# Altium PCB PCB1_Esta_SI.PcbDoc (part 2 of 2)
Units mil, origin at the board's own origin, x right, y up, seen from the top; angles counter-clockwise.
Board outline 3825 x 4015 mil, 4 copper layers (Top Layer, GND, POWER_SIGNAL, Bottom Layer), stack 23.756 mil thick; 87 components, 73 nets, 564 pads, 160 vias.
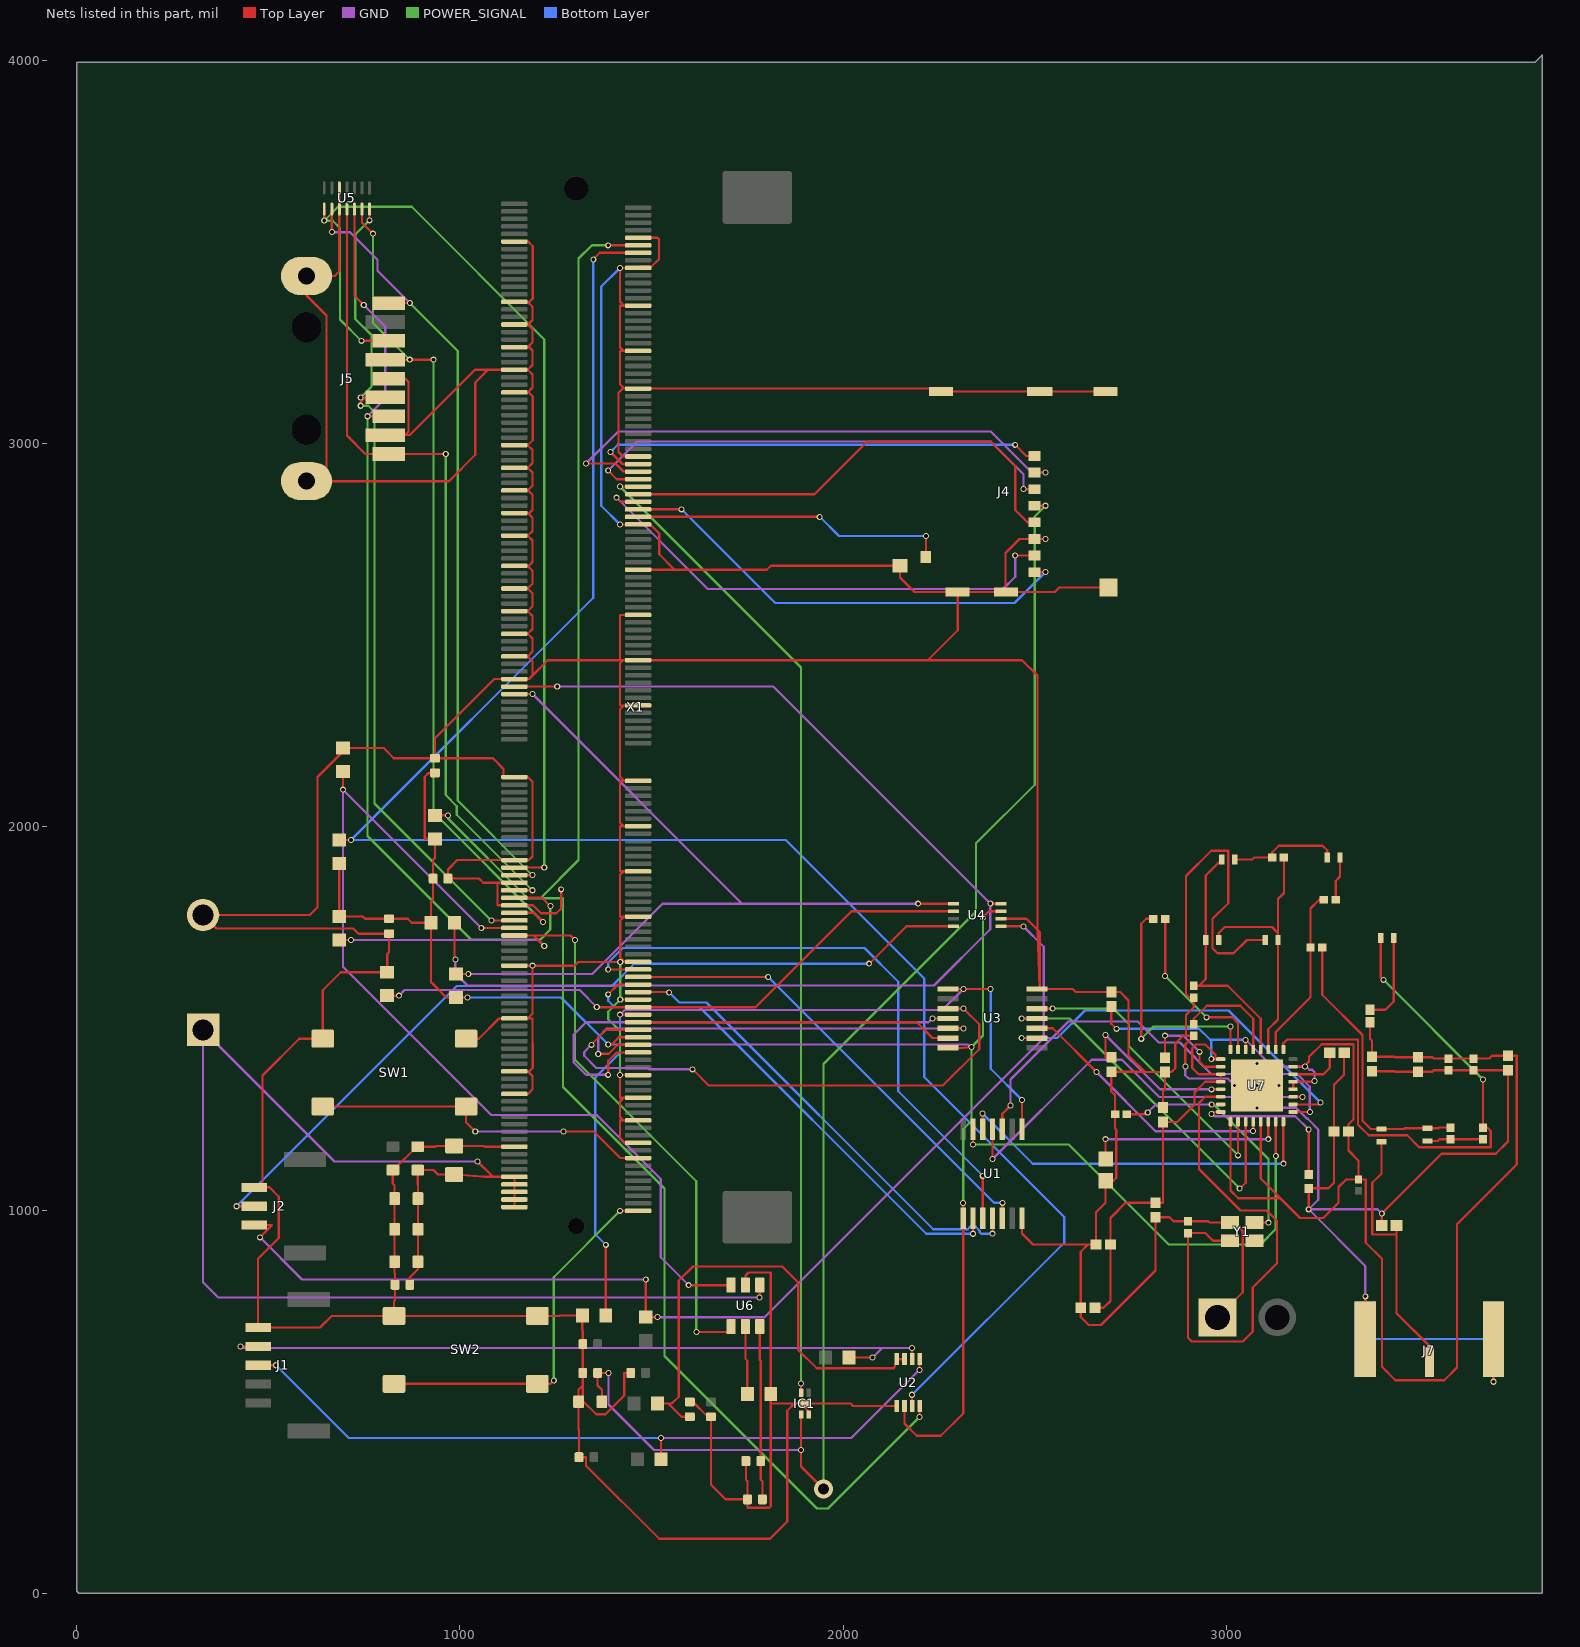
[diagram p4: the nets of this part, all layers, seen from the top]

## Via types
v1: diameter 15.75, hole 10, Top Layer to Bottom Layer, 154 vias
v2: diameter 19.68, hole 7.87, Top Layer to Bottom Layer, 5 vias
v3: diameter 50, hole 28, Top Layer to Bottom Layer, 1 vias

## Nets (pads, with @x,y where several pads share a name; then routed paths per layer and width w, separated by ;. In a path a pad name is that pad's centre, name@x,y a point inside that pad or via, vN(x,y) a via of type N, cw(c..) or ccw(c..) an arc to the next point about the centre after c; other vN are vias at no path point) (continued)
+1V8_SOM: C3.2 C4.2 C7.2 R3.1 R5.1 R6.1 R7.1 R11.1 U1.1 U2.2 U3.14 U4.3 X1.214 | length 4217.2
  Top Layer w5.91: R3.1@685,1904.42 R11.1@685,1766.16 746,1766.16 752.16,1760 C3.2@815,1760 864,1760 874,1750 R5.1@924.42,1750 ; C7.2@935,2140.71 917.71,2140.71 908,2131 908,1968.84 R7.1@935,1968.84 935,1919 930,1914 C4.2@930,1865 930,1809.58 924.42,1804 R5.1@924.42,1750 ; v1(1020,1555) R6.1@990,1555 964.42,1555 924.42,1595 R5.1@924.42,1750 ; v1(1387,1432) 1396,1432 1414.79,1450.79 X1.214@1465,1450.79 ; U2.2@2160.16,488.98 2160.16,443 2192.16,411 2255,411 2313.23,469.23 U1.1@2313.23,978.86 v1(2313.23,1018.77) ; U3.14@2273.86,1423.23 2314.37,1423.23 2315.36,1424.21 2333.82,1424.21 v1(2334.81,1425.19) ; v1(2365,1763.85) 2381,1779.85 U4.3@2411.89,1779.85
  GND w5.91: v1(1387,1432) 2325.34,1432 2332.14,1425.19 v1(2334.81,1425.19)
  POWER_SIGNAL w5.91: v1(2313.23,1018.77) 2313.23,1211.19 2334.81,1232.77 v1(2334.81,1425.19) ; v1@2335,1425 2335,1425.39 2365,1455.39 v1(2365,1763.85)
  Bottom Layer w5.91: v1(1020,1555) 1264,1555 v1(1387,1432)
+3V3_SD: C15.2 C16.2 IC1.1 J4.C4 | length 3795.2
  Top Layer w5.91: C15.2@1370.51,500 1370.51,531 1359.29,542.22 C16.2@1359.29,575 v1(1388,575) ; IC1.1@1890.16,466.46 v1(1890.16,374) 1890.16,330.84 v3(1949,272) ; J4.C4@2499.61,2838.03 v1(2528,2838.03)
  GND w5.91: v1(1388,575) 1388,492.53 1506.53,374 v1(1890.16,374)
  POWER_SIGNAL w5.91: v3(1949,272) 1949,1381 2347,1779 2347,1957 2500,2110 2500,2810.03 v1(2528,2838.03)
+5V_CAM_USB: C18.2 C19.2 U6.6 | length 453.7
  Top Layer w5.91: U6.6@1782.4,695.87 1782.4,608.6 1785,606 C19.2@1785,345 1785,296.29 1789.29,292 C18.2@1789.29,245
+5V_SOM: C8.2 C9.2 C10.2 C12.2 C13.2 C17.2 J3.1 U6.1 X1.251 X1.253 X1.255 X1.257 X1.259 | length 3719.2
  Top Layer w5.91: C17.2@869.29,805 869.29,824 890.51,845.22 C8.2@890.51,865 C9.2@890.51,950 C10.2@890.51,1030 890.51,1066 890,1066.51 C12.2@890,1104.49 931,1104.49 942.89,1092.6 C13.2@985,1092.6 1065.98,1086.61 1086,1086.61 ; v1(1045.61,1127) 1086,1086.61 ; X1.259@1142.17,1007.87 X1.257@1142.17,1027.56 X1.255@1142.17,1047.24 X1.253@1142.17,1066.93 X1.251@1142.17,1086.61 1086,1086.61 ; v1(1782,772) 1782.4,772.4 U6.1@1782.4,804.13
  GND w5.91: v1(1045.61,1127) 672.69,1127 J3.1@329.69,1470 329.69,811.31 369,772 v1(1782,772)
ADCS_RX: J2.3 R8.1 U4.1 | length 2954.6
  Top Layer w5.91: J2.3@463.46,960.79 509.8,960.79 v1(478.01,928.99) ; v1(1485,819) R8.1@1485,720.58 v1(1516,720.58) ; U4.1@2411.89,1740.47 2470.53,1740.47 v1(2471,1740)
  GND w5.91: v1(478.01,928.99) 588,819 v1(1485,819) ; v1(1516,720.58) 1795.12,720.58 2523.54,1449 2523.54,1687.46 v1(2471,1740)
ADCS_TX: J2.2 U4.8 | length 2220.1
  Top Layer w5.91: v1(417,1010) J2.2@463.46,1010 ; v1(2068.1,1643) 2165.57,1740.47 U4.8@2288.11,1740.47
  Bottom Layer w5.91: v1(417,1010) 992,1585 1397,1585 1455,1643 v1(2068.1,1643)
CAM_USB_D_N: J5.2 U5.13 X1.181 | length 2241.3
  Top Layer w5.91: U5.13@744.37,3612.42 744.37,3576.63 v1(773,3548) ; J5.2@805.07,3219.21 v1(869,3219.21) v1(931,3219.21) ; X1.181@1142.17,1775.59 1193.41,1775.59 v1(1217.08,1751.92)
  POWER_SIGNAL w5.91: v1(773,3548) 773,3315.21 v1(869,3219.21) ; v1(931,3219.21) 931,2038 v1(1217.08,1751.92)
CAM_USB_D_P: J5.3 U5.14 X1.183 | length 2183
  Top Layer w5.91: v1(741,3099) 741,3108.79 753,3120.79 ; v1(741,3120.79) 753,3120.79 ; v1(764,3583) 764.06,3583.06 U5.14@764.06,3612.42 ; J5.3@805.07,3120.79 753,3120.79 ; v1(1082,1755.91) X1.183@1142.17,1755.91
  POWER_SIGNAL w5.91: v1(741,3099) 761,3099 777,3083 777,2060.91 v1(1082,1755.91) ; v1(741,3120.79) 769,3148.79 769,3283.39 727,3325.39 727,3546 v1(764,3583)
CAM_USB_EN: R13.2 U6.3 X1.185 | length 2582.5
  Top Layer w5.91: v1(695,2097) R13.2@695,2144.42 ; v1(1055.78,1736.22) X1.185@1142.17,1736.22 ; v1(1597,804) 1707.6,804 U6.3@1707.6,804.13
  GND w5.91: v1(1055.78,1736.22) v1(695,2097) 695,1635 1082,1248 1357,1248 1524,1081 1524,877 v1(1597,804)
CAM_USB_OC_N: R11.2 U6.4 X1.187 | length 2002
  Top Layer w5.91: R11.2@685,1705 v1(716,1705) ; X1.187@1142.17,1716.54 1192.46,1716.54 ; v1(1220,1689) 1192.46,1716.54 ; v1(1300,1705) 1288.46,1716.54 1192.46,1716.54 ; v1(1617,682) 1707.6,682 U6.4@1707.6,695.87
  GND w5.91: v1(716,1705) 1204,1705 v1(1220,1689)
  POWER_SIGNAL w5.91: v1(1300,1705) 1300,1392 1617,1075 v1(1617,682)
CAM_USB_RX_N: J5.5 U5.11 X1.175 | length 2148.1
  Top Layer w5.91: U5.11@705,3612.42 705,3021.15 753,2973.15 J5.5@813.93,2973.15 v1(963,2973.15) ; X1.175@1142.17,1834.65 v1(1189,1834.65)
  POWER_SIGNAL w5.91: v1(963,2973.15) 963,2083 992,2054 992,2031.65 v1(1189,1834.65)
CAM_USB_RX_P: J5.6 U5.12 X1.177 | length 2507.8
  Top Layer w5.91: U5.12@724.69,3612.42 724.69,3386.31 v1(749,3362) ; v1(758.74,3071.57) J5.6@813.93,3071.57 ; X1.177@1142.17,1814.96 1214.21,1814.96 v1(1236,1793.17)
  GND w5.91: v1(749,3362) 805,3306 805,3117.84 v1(758.74,3071.57)
  POWER_SIGNAL w5.91: v1(758.74,3071.57) 758.74,1976.26 1029,1706 1210,1706 1236,1732 v1(1236,1793.17)
CAM_USB_TX_N: J5.8 U5.8 X1.169 | length 2656.6
  Top Layer w5.91: v1(645.94,3582) U5.8@645.94,3612.42 ; v1(742.74,3268.43) J5.8@813.93,3268.43 ; X1.169@1142.17,1893.7 v1(1220,1893.7)
  POWER_SIGNAL w5.91: v1(742.74,3268.43) 687,3324.16 687,3563 668,3582 v1(645.94,3582) 681.94,3618 874,3618 1220,3272 v1(1220,1893.7)
CAM_USB_TX_P: J5.9 U5.9 X1.171 | length 2084.8
  Top Layer w5.91: U5.9@665.63,3612.42 665.63,3552.37 v1(666,3552) ; J5.9@813.93,3366.85 v1(869.13,3366.85) ; X1.171@1142.17,1874.02 v1(1189,1874.02)
  GND w5.91: v1(666,3552) 713,3552 785,3480 785,3450.98 v1(869.13,3366.85)
  POWER_SIGNAL w5.91: v1(869.13,3366.85) 993.99,3241.99 993.99,2069.02 v1(1189,1874.02)
EPS_SCL: J1.2 R1.1 U2.6 | length 1927.6
  Top Layer w5.91: v1(427,644) 427.21,644.21 J1.2@473.46,644.21 ; R1.1@2015,615 v1(2077,615) ; U2.6@2179.84,611.02 2179.84,639.84 v1(2180,640)
  GND w5.91: v1(427,644) 431,640 2102,640 ; v1(2077,615) 2102,640 ; v1(2180,640) 2102,640
EPS_SDA: J1.3 R2.1 U2.5 | length 1961.5
  Top Layer w5.91: J1.3@473.46,595 v1(520,595) ; R2.1@1525,350 v1(1525,405) ; v1(2199.53,583) U2.5@2199.53,611.02
  GND w5.91: v1(1525,405) 2021.53,405 v1(2199.53,583)
  Bottom Layer w5.91: v1(520,595) 710,405 v1(1525,405)
GND: C1.1 C2.1 C3.1 C4.1 C5.1 C6.1 C7.1 C8.1 C9.1 C10.1 C11.1 C12.1 C13.1 C14.1 C15.1 C16.1 C17.1 C18.1 C19.1 C20.2 C21.2 C22.1 C23.1 C24.1 C25.1 C26.1 C28.1 C29.1 C30.2 C31.2 C32.1 C34.2 C38.2 C40.1 C41.1 C42.2 C43.2 C44.2 IC1.2 IC1.5 J1.1 J2.1 J3.2 J4.1 J4.3 J4.4 J4.5 J4.6 J4.7 J4.8 J4.C6 J5.4 J5.7 J5.Shell J6.1 J7.2 J7.3 J7.4 J7.5 L4.1 R9.1 R10.1 R12.1 R13.1 R14.1 R16.1 SW1.1 SW1.2 SW2.1 SW2.2 U1.7 U2.1 U3.7 U4.2 U5.5 U5.10 U6.2 U7.33 X1.10 X1.11 X1.18 X1.27 X1.28 X1.33 X1.39 X1.40 X1.45 X1.50 X1.51 X1.65 X1.68 X1.71 X1.77 X1.83 X1.86 X1.89 X1.97 X1.98 X1.103 X1.109 X1.110 X1.115 X1.121 X1.122 X1.127 X1.134 X1.145 X1.146 X1.158 X1.167 X1.170 X1.173 X1.179 X1.182 X1.194 X1.195 X1.204 X1.209 X1.223 X1.224 X1.229 X1.230 X1.236 X1.242 X1.243 Y1.2 Y1.4 | length 31570.9
  Top Layer w5.91: J2.1@463.46,1059.21 J2.1@485,1059.21 ; J5.Shell@599.56,2902.28 J5.Shell@652,2902.28 ; U5.5@685.32,3667.58 U5.10@685.32,3612.42 685.32,3450.03 673,3437.72 J5.Shell@599.56,3437.72 599.56,3387 652,3334.56 J5.Shell@652,2902.28 ; J5.4@805.07,3022.36 857,3022.36 ; J5.7@813.93,3170 857,3170 866,3161 866,3031.36 857,3022.36 ; SW1.1@1016.02,1447.29 1049,1447.29 1101.71,1500 X1.209@1142.17,1500 1177,1500 ; X1.243@1142.17,1165.35 1064.05,1165.35 1062,1167.4 C13.1@985,1167.4 937.89,1167.4 936,1165.51 C12.1@890,1165.51 887.02,1165.51 826,1104.49 C11.1@825,1104.49 825,1069.49 829.49,1065 C10.1@829.49,1030 C9.1@829.49,950 C8.1@829.49,865 829.49,835.22 830.71,834 C17.1@830.71,805 830.71,764.72 827.99,762 SW2.2@827.99,723.58 ; X1.229@1142.17,1303.15 1177.64,1303.15 1189.49,1315 1189.49,1349.71 1179.1,1360.1 ; X1.195@1142.17,1637.8 v1(1189.49,1637.8) ; X1.173@1142.17,1854.33 1098,1854.33 ; X1.121@1142.17,2444.88 1177,2444.88 ; X1.115@1142.17,2503.94 1177,2503.94 ; X1.109@1142.17,2562.99 1177,2562.99 ; X1.103@1142.17,2622.05 1177,2622.05 ; X1.97@1142.17,2681.1 1177,2681.1 ; X1.89@1142.17,2759.84 1177,2759.84 ; X1.83@1142.17,2818.9 1177,2818.9 ; X1.77@1142.17,2877.95 1177,2877.95 ; X1.71@1142.17,2937.01 1177,2937.01 ; X1.65@1142.17,2996.06 1177,2996.06 ; X1.33@1142.17,3311.02 1177.47,3311.02 ; X1.11@1142.17,3527.56 1177.44,3527.56 1190,3515 1190,3379 1179.04,3368.04 ; v1(1264.21,1837.17) 1264.21,1787 1251.66,1774.45 1211.59,1774.45 1190.76,1795.28 X1.179@1142.17,1795.28 1098,1795.28 1098,1854.33 ; v1(1417.68,2789.37) X1.86@1465,2789.37 1467.95,2786.42 1499.42,2786.42 1520,2765.84 1520,2711.26 1560,2671.26 ; v1(1418.36,1549.21) X1.204@1465,1549.21 ; C5.1@1445.71,575 1429,575 1429,516.29 1379.71,467 1355.71,467 1320.71,502 1320.71,542.22 ; X1.242@1465,1175.2 1429.48,1175.2 1417.68,1187 1417.68,1234.25 1426.42,1234.25 ; X1.236@1465,1234.25 1426.42,1234.25 ; X1.230@1465,1293.31 1427.98,1293.31 ; X1.224@1465,1352.36 v1(1418,1352.36) 1417.68,1352.36 1417.68,1293.31 1427.98,1293.31 ; X1.194@1465,1647.64 1429.72,1647.64 ; X1.182@1465,1765.75 1428.42,1765.75 ; X1.170@1465,1883.86 1426.53,1883.86 ; X1.158@1465,2001.97 1426.71,2001.97 ; X1.146@1465,2120.08 1428.6,2120.08 ; X1.134@1465,2316.93 1427.61,2316.93 ; X1.110@1465,2553.15 1417.68,2553.15 1417.68,2435.04 1425.72,2435.04 ; X1.98@1465,2671.26 1560,2671.26 ; X1.68@1465,2966.54 1425.46,2966.54 1414,2978 1414,3132.7 1426.99,3145.69 ; X1.40@1465,3242.13 1426.55,3242.13 ; X1.28@1465,3360.24 1428.44,3360.24 ; X1.10@1465,3537.4 1515.79,3537.4 1519.25,3533.94 1519.25,3481.44 1499.42,3461.61 1467.95,3461.61 X1.18@1465,3458.66 v1(1417.68,3458.66) 1417.68,3371 1428.44,3360.24 ; C1.1@1600,499.29 1608,499.29 1646.58,460.71 C6.1@1655,460.71 1655,283 1693,245 C18.1@1750.71,245 ; U6.2@1745,804.13 1745,829 1753,837 1811,837 1811.16,836.84 R12.1@1811.16,520 1811.16,495 ; C19.1@1746.42,345 1746.42,296.29 1750.71,292 C18.1@1750.71,245 ; IC1.2@1909.84,466.46 1909.84,475 1900,484.84 IC1.5@1900,495 ; U2.1@2140.47,488.98 2026.02,488.98 2020,495 IC1.5@1900,495 ; U4.2@2411.89,1760.16 2478.63,1760.16 2507,1731.79 ; U1.7@2466.77,978.86 2466.77,939 2495.77,910 2639,910 ; U3.7@2506.14,1576.77 U3.7@2513,1576.77 ; v1(2528.23,2751.42) J4.C6@2499.61,2751.42 2460.42,2751.42 2424,2715 J4.5@2424,2612.83 ; J4.8@2684.65,3136.46 J4.6@2513.39,3136.46 J4.3@2255.51,3136.46 2236,3136.46 2236,3143.7 X1.50@1465,3143.7 ; J4.7@2692.52,2624.64 2563.81,2624.64 2552,2612.83 J4.5@2424.8,2612.83 J4.5@2424,2612.83 ; C24.1@2835,1267.68 2835,1311 2840,1316 C25.1@2840,1360 ; v1(2893.05,1375) 2893.05,1431.91 2915,1453.86 C31.2@2915,1454.65 2895,1454.65 ; J6.1@2977.05,719.88 3043,785.83 3043,942.24 ; v2(3021.93,1325) v2(3080,1266.93) ; Y1.4@3073.98,920 3065.24,920 3043,942.24 ; L4.1@3101.54,1705 3054,1705 3019,1670 2977,1670 2964,1683 2964,1760 3005,1801 3005,1938 2961,1938 2895,1872 2895,1563 2903.35,1554.65 C28.1@2915,1554.65 2915,1529 2895,1509 2895,1454.65 ; v1(3215,1002) R14.1@3215,1056.73 3266.57,1056.73 3281.16,1071.32 C26.1@3281.16,1205 3281.16,1326.85 3307.4,1353.09 R16.1@3307.4,1410 ; J7.2@3362.68,663.31 v1(3362.68,775) ; C44.2@3380,1362.32 3439,1362.32 3440.16,1361.16 C43.2@3500,1361.16 3538,1361.16 3541.49,1364.65 C42.2@3580,1364.65 C41.1@3645,1364.65 3689,1364.65 3689.35,1365 C38.2@3735,1365 3735,1179 3703,1147 3561.71,1147 v1(3405.71,991) C40.1@3405.71,960 ; v1(3697,552) 3697.32,552.32 J7.3@3697.32,663.31 ; J2.1@485,1059.21 485,1351.29 581,1447.29 SW1.2@642.01,1447.29 642,1573.58 689,1620.58 R9.1@810,1620.58 810,1668 815,1673 C3.1@815,1721.42 735,1721.42 721.42,1735 364.69,1735 J3.2@329.69,1770 608,1770 628,1790 628,2130 695,2197 R13.1@695,2205.58 801,2205.58 827.29,2179.29 C7.1@935,2179.29 ; J2.1@485,1059.21 502.79,1059.21 527,1035 527,927 473,873 473,693.43 J1.1@473.46,693.43 635,693.43 665.16,723.58 SW2.2@827.99,723.58 ; J5.Shell@652,2902.28 971.28,2902.28 1040,2971 1040,3159.91 1073,3192.91 ; SW2.2@827.99,723.58 SW2.1@1202.01,723.58 1260,723.58 1261.42,725 R10.1@1319.42,725 1319.42,687.29 1320.71,686 C14.1@1320.71,650 C16.1@1320.71,575 1320.71,542.22 ; 857,3022.36 869,3022.36 1039.55,3192.91 1073,3192.91 ; C7.1@935,2179.29 1086,2179.29 1114,2151.29 1114,2129.92 X1.145@1142.17,2129.92 1177,2129.92 1189.49,2117.43 1189.49,1923 1179.88,1913.39 X1.167@1142.17,1913.39 993,1913.39 968.58,1888.97 C4.1@968.58,1865 1050,1865 1060.67,1854.33 1098,1854.33 ; C7.1@935,2179.29 935,2231 1089.83,2385.83 X1.127@1142.17,2385.83 1180.32,2385.83 1189.49,2395 ; 1073,3192.91 X1.45@1142.17,3192.91 1177,3192.91 ; 1177,1500 1189.49,1500 1190,1371 1179.1,1360.1 ; 1177,1500 1189.49,1512.49 v1(1189.49,1637.8) ; 1177,2444.88 1189.49,2432.39 1189.49,2395 ; 1177,2444.88 1189.49,2457.37 1189.49,2491.45 1177,2503.94 ; 1177,2503.94 1189.49,2516.43 1189.49,2550.5 1177,2562.99 ; 1177,2562.99 1189.49,2575.48 1189.49,2609.56 1177,2622.05 ; 1177,2622.05 1189.49,2634.54 1189.49,2668.61 1177,2681.1 ; 1177,2681.1 1179.59,2681.1 1189.49,2691 1189.49,2747.35 1177,2759.84 ; 1177,2759.84 1189.49,2772.33 1189.49,2806.41 1177,2818.9 ; 1177,2818.9 1181.39,2818.9 1189.49,2827 1189.49,2867 1178.54,2877.95 1177,2877.95 ; 1177,2877.95 1189.49,2890.44 1189.49,2924.52 1177,2937.01 ; 1177,2937.01 1189.49,2949.5 1189.49,2983.57 1177,2996.06 ; 1177,2996.06 1190,3009.06 1190,3123 1178.07,3134.93 ; 1177,3192.91 1189.49,3180.42 1189.49,3146.35 1178.07,3134.93 ; 1177,3192.91 1189.49,3205.4 1189.49,3243 1178.76,3253.73 ; 1177.47,3311.02 1189.49,3299 1189.49,3264.46 1178.76,3253.73 ; 1177.47,3311.02 1189.49,3323 1189.49,3357.59 1179.04,3368.04 ; 1178.07,3134.93 1177,3133.86 X1.51@1142.17,3133.86 1178.07,3134.93 ; 1178.76,3253.73 X1.39@1142.17,3251.97 1177,3251.97 1178.76,3253.73 ; 1179.04,3368.04 1177,3370.08 X1.27@1142.17,3370.08 1179.04,3368.04 ; 1179.1,1360.1 1176.89,1360.23 X1.223@1142.17,1362.2 1177,1362.2 1179.1,1360.1 ; v1(1189.49,1637.8) 1298.93,1637.8 1308.77,1647.64 v1(1418.36,1647.64) 1429.72,1647.64 ; 1189.49,2395 1229.49,2435 1425.68,2435 ; 1320.71,542.22 1309.49,531 C15.1@1309.49,500 1309.49,427.22 1310.71,426 C2.1@1310.71,355 1329,355 1329,333 1520,142 1809,142 1854,187 1854,476 1873,495 ; 1425.68,2435 2467,2435 2507,2395 2507,1731.79 ; 1425.68,2435 1417.68,2427 1417.68,2316.93 1427.61,2316.93 ; 1425.68,2435 1425.72,2435.04 ; 1425.72,2435.04 X1.122@1465,2435.04 2221.04,2435.04 2298.82,2512.82 J4.4@2298.82,2612.83 ; 1426.42,1234.25 1417.68,1243 1417.68,1283 1427.98,1293.31 ; 1426.53,1883.86 1417.68,1883.86 1417.68,2001.97 1426.71,2001.97 ; 1426.53,1883.86 1417.68,1875 1417.68,1765.75 1428.42,1765.75 ; 1426.55,3242.13 1417.68,3242.13 1417.68,3155 1426.99,3145.69 ; 1426.55,3242.13 1417.68,3251 1417.68,3360.24 1428.44,3360.24 ; 1426.71,2001.97 1417.68,2011 1417.68,2120.08 1428.6,2120.08 ; 1426.99,3145.69 1428.98,3143.7 X1.50@1465,3143.7 ; 1426.99,3145.69 X1.50@1465,3143.7 ; 1427.61,2316.93 1417.68,2307 1417.68,2131 1428.6,2120.08 ; 1428.42,1765.75 1418.36,1755.69 1418.36,1659 1429.72,1647.64 ; 1560,2671.26 1801,2671.26 1811.47,2681.73 J4.1@2148.43,2681.73 2148.43,2650.57 2186.17,2612.83 J4.4@2298.82,2612.83 ; C18.1@1750.71,245 1750.71,223 1807,223 1811.16,227.16 1811.16,495 ; 1811.16,495 1873,495 ; 1873,495 IC1.5@1900,495 ; J4.4@2298.82,2612.83 J4.5@2424,2612.83 ; 2507,1731.79 2513,1725.79 U3.7@2513,1576.77 ; 2507,1731.79 2512.99,1577.04 U3.7@2513,1576.77 ; U3.7@2513,1576.77 2599,1576.77 2606.93,1568.84 C30.2@2700,1568.84 2723.16,1568.84 2745,1547 2745,1403 2788,1360 ; 2639,910 2620,891 C29.1@2620,745 2620,721 2641,700 2673,700 2815,842 C23.1@2815,981.16 2852,981.16 2862.45,970.71 C21.2@2900,970.71 2953,970.71 2956.46,967.24 Y1.2@3010,967.24 3021.24,967.24 3043,945.48 3043,942.24 ; 2639,910 C32.1@2660,910 2660,994 2685,1019 C34.2@2685,1076.42 2705,1076.42 2713,1084.42 2713,1209.65 2709.65,1213 C20.2@2709.65,1250 2709.65,1300 2700,1309.65 C22.1@2700,1361.16 2769,1361.16 2770.16,1360 2788,1360 ; 2788,1360 C25.1@2840,1360 ; C25.1@2840,1360 2857,1360 2867,1370 2867,1435 2886.65,1454.65 2895,1454.65
  GND w5.91: v1(2893.05,1375) 2893.05,1351.95 2901.81,1343.19 3003.74,1343.19 v2(3021.93,1325) ; v2(3080,1266.93) 3181.78,1266.93 3210.56,1238.15 3212.24,1238.15 3240,1210.39 3240,1027 v1(3215,1002) ; v1(3362.68,775) 3362.68,854.32 v1(3215,1002) ; v1(3405.71,991) 3394.71,1002 v1(3215,1002)
  POWER_SIGNAL w5.91: v1(1418,1352.36) 1418,1467 1387,1498 1387,1517.85 v1(1418.36,1549.21) v1(1418.36,1647.64)
  Bottom Layer w5.91: v1(1417.68,2789.37) 1369.05,2838 1369.05,3410.03 v1(1417.68,3458.66) ; v1(3362.68,775) J7.4@3362.68,663.31 J7.5@3697.32,663.31 3697.32,552.32 v1(3697,552)
  other v2: 3080,1325 3138.07,1325 3080,1383.07
GPIO0: U3.2 U7.10 | length 1023.1
  Top Layer w5.91: v1(2466,1449) 2466.18,1448.82 U3.2@2506.14,1448.82 ; U7.10@3174.49,1275.79 3240.79,1275.79 v1(3246,1281)
  Bottom Layer w5.91: v1(2466,1449) 2559,1449 2631,1521 3006,1521 v1(3246,1281)
GPIO2: U3.3 U7.4 | length 699.6
  Top Layer w5.91: U3.3@2506.14,1474.41 2547,1474.41 v1(2661.41,1360) ; v1(3070,1206) 3070.16,1206.16 U7.4@3070.16,1230.51
  GND w5.91: v1(2661.41,1360) 2815.41,1206 v1(3070,1206)
GPIO3: U3.4 U7.3 | length 974
  Top Layer w5.91: v1(2466,1500) U3.4@2506.14,1500 ; v1(3035,1056) 3050.47,1071.47 U7.3@3050.47,1230.51
  POWER_SIGNAL w5.91: v1(2466,1500) 2591,1500 v1(3035,1056)
I2C_1_SCL: R3.2 U2.3 X1.14 | length 5008.8
  Top Layer w5.91: R3.2@685,1965.58 v1(715.83,1965.58) ; v1(1348,3481) 1365.03,3498.03 X1.14@1465,3498.03 ; U2.3@2179.84,488.98 2179.84,517.84 v1(2180,518)
  Bottom Layer w5.91: v1(1348,3481) 1348,2597.75 v1(715.83,1965.58) 1850.42,1965.58 2212,1604 2212,1347 2577,982 2577,915 v1(2180,518)
I2C_1_SDA: R7.2 U2.4 X1.12 | length 4570.7
  Top Layer w5.91: R7.2@935,2030 v1(969,2030) ; v1(1387,3517.72) X1.12@1465,3517.72 ; v1(2199.53,460) U2.4@2199.53,488.98
  POWER_SIGNAL w5.91: v1(969,2030) 969,2022 1177,1814 1210,1814 ; v1(1387,3517.72) 1344.43,3517.72 1309.72,3483 1309.72,1913.72 1210,1814 ; v1(2199.53,460) 1960.53,221 1932,221 1534,619 1534,1056 1268.73,1321.27 1268.73,1813.35 1268.08,1814 1210,1814
NetC1_2: C1.2 R4.2 U2.7 U2.8 | length 1271.5
  Top Layer w5.91: R4.2@1515.58,495 1543.71,495 ; C1.2@1600,460.71 1578,460.71 1543.71,495 ; U2.7@2160.16,611.02 U2.8@2140.47,611.02 2132.47,587 1931,587 1883,635 1883,811 1841,853 1608,853 1571,816 1571,513 1553,495 1543.71,495
NetC20_1: C20.1 U7.31 Y1.1 | length 665.2
  Top Layer w5.91: C20.1@2740.35,1250 2790,1250 v1(2795,1255) ; v1(2961.9,1275.79) U7.31@2985.51,1275.79 ; Y1.1@3073.98,967.24 3109.76,967.24 v1(3110,967)
  GND w5.91: v1(2795,1255) 2815.79,1275.79 v1(2961.9,1275.79)
  POWER_SIGNAL w5.91: v1(2961.9,1275.79) 2967.21,1275.79 3110,1133 v1(3110,967)
NetC21_1: C21.1 U7.30 Y1.3 | length 1384.8
  Top Layer w5.91: U7.30@2985.51,1295.47 2945,1295.47 2929,1279.47 2929,1107 3037,999 3105,999 3132,972 3132,861 3069,798 3069,683 3043,657 2910,657 2900,667 C21.1@2900,940 2945,940 2965,920 Y1.3@3010,920
NetC22_2: C22.2 U7.29 | length 432.4
  Top Layer w5.91: v1(2685,1457) 2685,1398.84 C22.2@2700,1398.84 ; v1(2961,1315.16) U7.29@2985.51,1315.16
  GND w5.91: v1(2685,1457) 2826.84,1315.16 v1(2961,1315.16)
NetC25_2: C25.2 U7.26 | length 251.5
  Top Layer w5.91: C25.2@2840,1397.68 v1(2840,1455) ; v1(2930,1413) 2930,1387 2942.79,1374.21 U7.26@2985.51,1374.21
  GND w5.91: v1(2840,1455) 2888,1455 v1(2930,1413)
NetC27_1: C27.1 U7.23 | length 459.1
  Top Layer w5.91: v1(2840.35,1610.65) C27.1@2840.35,1760 ; v1(2948,1503) 3015.79,1503 3030.79,1488 U7.23@3030.79,1419.49
  POWER_SIGNAL w5.91: v1(2840.35,1610.65) v1(2948,1503)
NetC27_2: C27.2 U7.24 | length 642.9
  Top Layer w5.91: v1(2778,1447) 2778,1747 2791,1760 C27.2@2809.65,1760 ; U7.24@3011.1,1419.49 v1(3011.1,1479)
  POWER_SIGNAL w5.91: v1(2778,1447) 2810,1479 v1(3011.1,1479)
NetC28_2: C28.2 L1.1 L2.1 U7.20 | length 644.6
  Top Layer w5.91: C28.2@2915,1585.35 2929,1585.35 ; L1.1@2988.27,1915 2946.54,1873.27 L2.1@2946.54,1705 2946.54,1602.89 2929,1585.35 ; U7.20@3089.84,1419.49 3089.84,1499.51 3004,1585.35 2929,1585.35
NetC31_1: C31.1 U7.21 | length 276.5
  Top Layer w5.91: C31.1@2915,1485.35 2915,1499 2949,1533 3036.16,1533 3070.16,1499 U7.21@3070.16,1419.49
NetC33_1: C33.1 L1.2 L3.1 | length 288.4
  Top Layer w5.91: L1.2@3021.73,1915 3068,1915 3073,1920 C33.1@3119.65,1920 3119.65,1933.65 3137,1951 3251.27,1951 3263.27,1939 L3.1@3263.27,1920
NetC33_2: C33.2 L2.2 L4.2 U7.19 | length 703.7
  Top Layer w5.91: L2.2@2980,1705 2980,1723 2996,1739 3119,1739 3135,1723 ; U7.19@3109.53,1419.49 3109.53,1472 3135,1497.47 L4.2@3135,1705 3135,1723 ; C33.2@3150.35,1920 3150.35,1827.35 3135,1812 3135,1723
NetC34_1: C34.1 U7.6 | length 521.5
  Top Layer w5.91: C34.1@2685,1133.58 v1(2685,1185) ; v1(3109.53,1185) U7.6@3109.53,1230.51
  GND w5.91: v1(2685,1185) v1(3109.53,1185)
NetC35_1: C35.1 L3.2 | length 114.7
  Top Layer w5.91: C35.1@3285.35,1810 3285.35,1859 3296.73,1870.38 L3.2@3296.73,1920
NetC35_2: C35.2 C36.1 U7.18 | length 449.5
  Top Layer w5.91: U7.18@3129.21,1419.49 3129.21,1465 3219.65,1555.43 C36.1@3219.65,1685 3219.65,1787 3242.65,1810 C35.2@3254.65,1810
NetC36_2: C36.2 C39.2 L6.2 L7.1 | length 735.2
  Top Layer w5.91: C36.2@3250.35,1685 3250.35,1561.89 3355.62,1456.62 3355.62,1233.11 3377,1211.73 L7.1@3405,1211.73 3464,1211.73 3465.73,1213.46 L6.2@3525,1213.46 3554,1213.46 3555.89,1215.35 C39.2@3585,1215.35
NetC37_1: C37.1 L5.2 U7.17 | length 1478.5
  Top Layer w5.91: U7.17@3148.9,1419.49 3148.9,1435 3158.9,1445 3343.81,1445 3343.81,1222.82 3371.63,1195 3472,1195 3503,1164 3690,1164 3690,1206.35 3681,1215.35 C37.1@3670,1215.35 v1(3670,1341) ; L5.2@3403.27,1710 3403.27,1607.73 v1(3410,1601)
  POWER_SIGNAL w5.91: v1(3410,1601) v1(3670,1341)
NetC37_2: C37.2 C39.1 L6.1 | length 146.9
  Top Layer w5.91: L6.1@3525,1180 3552,1180 3556.65,1184.65 C39.1@3585,1184.65 C37.2@3670,1184.65
NetC40_2: C40.2 J7.1 L7.2 | length 707.3
  Top Layer w5.91: L7.2@3405,1178.27 3405,1095 3381,1071 3381,936 3444.29,936 ; C40.2@3444.29,960 3444.29,936 ; J7.1@3530,603.66 3530,645 3444.29,730.71 3444.29,936
NetL5_1: L5.1 R15.2 | length 236.5
  Top Layer w5.91: R15.2@3375,1522.72 3415.45,1522.72 3436.73,1544 L5.1@3436.73,1710
NetR12_2: R12.2 U6.5 | length 177.9
  Top Layer w5.91: U6.5@1745,695.87 1745,612 1750,607 R12.2@1750,520
NetR14_2: R14.2 U7.32 | length 414.3
  Top Layer w5.91: v1(2961,1251) 2966.1,1256.1 U7.32@2985.51,1256.1 ; R14.2@3215,1093.27 v1(3215,1210)
  GND w5.91: v1(2961,1251) 2963.38,1251 2969.38,1245 3180,1245 v1(3215,1210)
NetR16_2: R16.2 U7.14 | length 141.3
  Top Layer w5.91: U7.14@3174.49,1354.53 3253.53,1354.53 3270,1371 R16.2@3270,1410
OBC_RADIO_GPIO0_1V8: U3.13 X1.210 | length 826
  Top Layer w5.91: X1.210@1465,1490.16 2191.84,1490.16 2233.18,1448.82 U3.13@2273.86,1448.82
OBC_RADIO_GPIO2_1V8: U3.12 X1.216 | length 1159.8
  Top Layer w5.91: v1(1361,1407.69) 1388.59,1407.69 1412,1431.1 X1.216@1465,1431.1 ; U3.12@2273.86,1474.41 2313.59,1474.41 v1(2314,1474)
  GND w5.91: v1(1361,1407.69) 1361,1450.94 1384.06,1474 v1(2314,1474)
OBC_RADIO_GPIO3_1V8: U3.11 X1.218 | length 1294
  Top Layer w5.91: v1(1387,1353) 1387,1389.4 1409.02,1411.42 X1.218@1465,1411.42 ; v1(2233,1500) U3.11@2273.86,1500
  GND w5.91: v1(1387,1353) 1329,1353 1297,1385 1297,1458 1329,1490 2223,1490 v1(2233,1500)
OBC_RADIO_RESET_N_1V8: U3.10 X1.212 | length 1439.8
  Top Layer w5.91: v1(1342.95,1431.33) 1382.1,1470.47 X1.212@1465,1470.47 ; v1(1607.33,1367.33) 1649.65,1325 2260,1325 2355,1420 2355,1484.96 v1(2314.37,1525.59) U3.10@2273.86,1525.59
  GND w5.91: v1(1342.95,1431.33) 1324.35,1412.72 1324.35,1402.55 1355.95,1370.95 1490.3,1370.95 1493.93,1367.33 v1(1607.33,1367.33)
OBC_RECOVERY_N: SW1.3 SW1.4 X1.246 | length 902.7
  Top Layer w5.91: SW1.4@642.01,1270.12 SW1.3@1016.02,1270.12 1016.02,1228.98 v1(1040,1205) ; v1(1270,1205) 1349,1205 1418.17,1135.83 X1.246@1465,1135.83
  GND w5.91: v1(1040,1205) v1(1270,1205)
OBC_RESET_IN_N: SW2.3 SW2.4 X1.260 | length 982.2
  Top Layer w5.91: SW2.4@827.99,546.42 SW2.3@1202.01,546.42 1236.42,546.42 v1(1245,555) ; v1(1418,998) X1.260@1465,998.03
  POWER_SIGNAL w5.91: v1(1245,555) 1245,825 v1(1418,998)
OBC_SPI_CS_N_1V8: U1.4 X1.202 | length 1234.5
  Top Layer w5.91: X1.202@1465,1568.9 1545.25,1568.9 v1(1546.1,1568.05) ; v1(2390,938.35) U1.4@2390,978.86
  Bottom Layer w5.91: v1(1546.1,1568.05) 1546.95,1568.05 1546.95,1567.2 1572.34,1541.81 1643.19,1541.81 2235.01,949.99 2325.24,949.99 2331.38,956.13 2346.25,956.13 2356.77,945.62 2356.77,941.81 2360.23,938.35 v1(2390,938.35)
OBC_SPI_MISO_1V8: U1.5 X1.198 | length 1235.4
  Top Layer w5.91: X1.198@1465,1608.27 v1(1804.49,1608.27) ; U1.5@2415.59,978.86 2415.59,1018.59 v1(2416,1019)
  Bottom Layer w5.91: v1(1804.49,1608.27) 2393.76,1019 v1(2416,1019)
OBC_SPI_MOSI_1V8: U1.2 X1.200 | length 1349.9
  Top Layer w5.91: v1(1387,1563) 1412.58,1588.58 X1.200@1465,1588.58 ; v1(2338.82,938.18) U1.2@2338.82,978.86
  Bottom Layer w5.91: v1(1387,1563) 1387,1546 1403,1530 1625,1530 2216.82,938.18 v1(2338.82,938.18)
OBC_SPI_OE: R10.2 U1.8 U3.8 X1.208 | length 2305.5
  Top Layer w5.91: R10.2@1380.58,725 v1(1380.58,909.42) ; v1(1417.68,1509.84) X1.208@1465,1509.84 ; U3.8@2273.86,1576.77 v1@2313.77,1576.77 ; v1(2314,1577) v1@2313.77,1576.77 ; v1(2385,1576.77) v1@2313.77,1576.77 ; U1.8@2466.77,1211.14 v1(2466.77,1287)
  GND w5.91: v1(1417.68,1509.84) 1429.83,1522 2259,1522 v1(2314,1577)
  Bottom Layer w5.91: v1(1380.58,909.42) 1353,937 1353,1346 1417.68,1410.68 v1(1417.68,1509.84) ; v1(2385,1576.77) 2385,1368.77 v1(2466.77,1287)
OBC_SPI_SCK_1V8: U1.3 X1.196 | length 1613.7
  Top Layer w5.91: v1(1387,1627.95) X1.196@1465,1627.95 ; U1.3@2364.41,978.86 v1(2364.41,1089.41)
  Bottom Layer w5.91: v1(1387,1627.95) 1387,1646 1425,1684 2056,1684 2144,1596 2144,1309.82 v1(2364.41,1089.41)
OBC_UART1_RX_1V8: R5.2 U4.4 X1.129 | length 3174.8
  Top Layer w5.91: R5.2@985.58,1750 985.58,1656.42 v1(988,1654) ; X1.129@1142.17,2366.14 v1(1254,2366.14) ; v1(2384,1800) 2384.46,1799.54 U4.4@2411.89,1799.54
  GND w5.91: v1(988,1654) 988,1617.66 1019.66,1586 2237,1586 2384,1733 v1(2384,1800) 1817.86,2366.14 v1(1254,2366.14)
OBC_UART1_TX_1V8: R6.2 U4.5 X1.131 | length 2194.9
  Top Layer w5.91: R6.2@990,1616.16 v1(1021.84,1616.16) ; X1.131@1142.17,2346.46 v1(1189.49,2346.46) ; v1(2196,1799.54) U4.5@2288.11,1799.54
  GND w5.91: v1(1021.84,1616.16) 1345,1616.16 1528.38,1799.54 1736.41,1799.54 ; v1(1189.49,2346.46) 1736.41,1799.54 ; v1(2196,1799.54) 1736.41,1799.54
OBC_UART_OE: R9.2 U4.6 X1.206 | length 1606.3
  Top Layer w5.91: R9.2@810,1559.42 v1(841,1559.42) ; v1(1357,1529.53) X1.206@1465,1529.53 1771.53,1529.53 2021.85,1779.85 U4.6@2288.11,1779.85
  GND w5.91: v1(841,1559.42) 855.58,1574 1312.53,1574 v1(1357,1529.53)
RESET: U3.5 U7.2 | length 804.5
  Top Layer w5.91: U3.5@2506.14,1525.59 2546.59,1525.59 v1(2547,1526) ; v1(3030.79,1143) U7.2@3030.79,1230.51
  POWER_SIGNAL w5.91: v1(2547,1526) 2705,1526 2746,1485 2746,1427.79 v1(3030.79,1143)
SD_1_CLK: J4.C5 X1.78 | length 1245.3
  Top Layer w5.91: X1.78@1465,2868.11 1925.11,2868.11 2062,3005 2385,3005 2449,2941 2449,2826.72 2481,2794.72 J4.C5@2499.61,2794.72
SD_1_CMD: J4.C3 X1.74 | length 1305.7
  Top Layer w5.91: v1(1387,2930) 1409.52,2907.48 X1.74@1465,2907.48 ; v1(2471,2881.34) J4.C3@2499.61,2881.34
  GND w5.91: v1(1387,2930) 1463,3006 2385,3006 2471,2920 v1(2471,2881.34)
SD_1_D0: J4.C7 X1.80 | length 1317.9
  Top Layer w5.91: v1(1409,2859) 1419.57,2848.43 X1.80@1465,2848.43 ; v1(2449,2708.11) J4.C7@2499.61,2708.11
  GND w5.91: v1(1409,2859) 1647,2621 2417,2621 2449,2653 v1(2449,2708.11)
SD_1_D1: J4.C8 X1.82 | length 1226.4
  Top Layer w5.91: X1.82@1465,2828.74 v1(1578.26,2828.74) ; J4.C8@2499.61,2664.8 2527.8,2664.8 v1(2528,2665)
  Bottom Layer w5.91: v1(1578.26,2828.74) 1823,2584 2447,2584 v1(2528,2665)
SD_1_D2: J4.C1 X1.70 | length 1211.4
  Top Layer w5.91: v1(1393,2978) 1424.15,2946.85 X1.70@1465,2946.85 ; v1(2449,2997) 2478.05,2967.95 J4.C1@2499.61,2967.95
  Bottom Layer w5.91: v1(1393,2978) 1412,2997 v1(2449,2997)
SD_1_D3: J4.C2 X1.72 | length 1451.3
  Top Layer w5.91: v1(1329,2948) 1406,2948 1426.83,2927.17 X1.72@1465,2927.17 ; J4.C2@2499.61,2924.64 2527.64,2924.64 v1(2528,2925)
  GND w5.91: v1(1329,2948) 1413,3032 2385,3032 2492,2925 v1(2528,2925)
SD_1_PWR_EN: IC1.4 X1.76 | length 2607.1
  Top Layer w5.91: v1(1418,2888) 1418.2,2887.8 X1.76@1465,2887.8 ; v1(1890,547) 1890.16,546.84 IC1.4@1890.16,523.54
  POWER_SIGNAL w5.91: v1(1418,2888) 1890,2416 v1(1890,547)
SD_CARD_PRESENT: J4.2 X1.84 | length 826.3
  Top Layer w5.91: X1.84@1465,2809.06 v1(1938.94,2809.06) ; J4.2@2216.14,2704.57 v1(2216.14,2759)
  Bottom Layer w5.91: v1(1938.94,2809.06) 1989,2759 v1(2216.14,2759)
SPI_CS: U1.11 U7.11 | length 1059.3
  Top Layer w5.91: v1(2390,1133) U1.11@2390,1211.14 ; U7.11@3174.49,1295.47 3198.53,1295.47 v1(3199,1295)
  GND w5.91: v1(2390,1133) 2649,1392 2728,1392 2825,1295 v1(3199,1295)
SPI_MISO: U1.10 U7.9 | length 1162.1
  Top Layer w5.91: U1.10@2415.59,1211.14 2415.59,1251.59 v1(2437,1273) ; U7.9@3174.49,1256.1 v1(3218,1256.1)
  GND w5.91: v1(2437,1273) 2437,1341 2588,1492 2769,1492 2824,1437 2879,1437 2961,1355 3185,1355 3218,1322 v1(3218,1256.1)
SPI_MOSI: U1.13 U7.7 | length 1235.2
  Top Layer w5.91: U1.13@2338.82,1211.14 2338.82,1171.18 v1(2339,1171) ; v1(3129.21,1141) U7.7@3129.21,1230.51
  POWER_SIGNAL w5.91: v1(2339,1171) 2589,1171 2849.79,910.21 3089,910.21 3129.21,950.42 v1(3129.21,1141)
SPI_SCK: U1.12 U7.8 | length 989.8
  Top Layer w5.91: v1(2364,1252) 2364.41,1251.59 U1.12@2364.41,1211.14 ; U7.8@3148.9,1230.51 3148.9,1121.1 v1(3149,1121)
  Bottom Layer w5.91: v1(2364,1252) 2495,1121 v1(3149,1121)
VDD_REG: C23.2 C24.2 C26.2 C29.2 C30.1 C32.2 C38.1 C41.2 C42.1 C43.1 C44.1 FB1.2 R15.1 U7.1 U7.5 U7.12 U7.13 U7.15 U7.22 U7.25 U7.27 U7.28 | length 5468.7
  Top Layer w5.91: C29.2@2657.68,745 2679.68,745 2697.68,763 C32.2@2697.68,910 2697.68,979.52 2737,1018.84 C23.2@2815,1018.84 2835,1018.84 C24.2@2835,1230 2872,1230 2917,1275 2917,1307 2944.84,1334.84 U7.28@2985.51,1334.84 U7.27@2985.51,1354.53 2927.47,1354.53 2911,1371 2911,1422 2921,1432 2945,1432 2972,1405 2972,1393.9 ; C30.1@2700,1531.16 2700,1486 v1(2713,1473) ; v1(2960.83,1393.9) 2972,1393.9 ; U7.25@2985.51,1393.9 2972,1393.9 ; U7.1@3011.1,1230.51 3011.1,1051 3031.1,1031 3140,1031 3192,979 3193,979 ; U7.22@3050.47,1419.49 v1(3050.47,1444.17) ; U7.5@3089.84,1230.51 3089.84,1082.16 3193,979 ; U7.12@3174.49,1315.16 U7.13@3174.49,1334.84 3228.27,1334.84 v1(3230,1336.58) ; U7.15@3174.49,1374.21 3174.88,1374.61 3204.61,1374.61 v1(3205,1375) 3205,1376.85 3215.91,1387.76 3215.91,1399.91 3249,1433 3332,1433 3332,1237.16 3318.84,1224 C26.2@3318.84,1205 3318.84,1155.16 3345,1129 FB1.2@3345,1080 ; R15.1@3375,1490 3375,1447 3380,1442 C44.1@3380,1400 3439,1400 3440.16,1398.84 C43.1@3500,1398.84 3538,1398.84 3541.49,1395.35 C42.1@3580,1395.35 C41.2@3645,1395.35 3686,1395.35 3693.33,1402.68 C38.1@3735,1402.68 3758,1402.68 3758,1119 3602,963 3602,589 3569,556 3441,556 3406,591 3406,873 3364,915 3364,1080 FB1.2@3345,1080 ; 3193,979 3253,979 3293,1019 3293,1060 3313,1080 FB1.2@3345,1080
  GND w5.91: v1(3050.47,1444.17) 3120.64,1374 3198.96,1374 v1@3199.17,1374.21 ; v1(3205,1375) 3207.66,1375 3216.58,1366.08 3223.92,1366.08 3230,1360 v1(3230,1336.58)
  Bottom Layer w5.91: v1(2713,1473) 2929,1473 2957.83,1444.17 ; v1(2960.83,1393.9) 2960.83,1441.17 2957.83,1444.17 ; v1(3050.47,1444.17) 2957.83,1444.17
pads on no net: C11.2 J1.4 J1.5 J1.6 J1.7 J2.4 J2.5 J5.1 J5.MH1 J5.MH2 U1.6 U1.9 U3.6 U3.9 U5.1 U5.2 U5.3 U5.4 U5.6 U5.7 U7.16 X1. X1.1 X1.2 X1.3 X1.4 X1.5 X1.6 X1.7 X1.8 X1.9 X1.13 X1.15 X1.16 X1.17 X1.19 X1.20 X1.21 X1.22 X1.23 X1.24 X1.25 X1.26 X1.29 X1.30 X1.31 X1.32 X1.34 X1.35 X1.36 X1.37 X1.38 X1.41 X1.42 X1.43 X1.44 X1.46 X1.47 X1.48 X1.49 X1.52 X1.53 X1.54 X1.55 X1.56 X1.57 X1.58 X1.59 X1.60 X1.61 X1.62 X1.63 X1.64 X1.66 X1.67 X1.69 X1.73 X1.75 X1.79 X1.81 X1.85 X1.87 X1.88 X1.90 X1.91 X1.92 X1.93 X1.94 X1.95 X1.96 X1.99 X1.100 X1.101 X1.102 X1.104 X1.105 X1.106 X1.107 X1.108 X1.111 X1.112 X1.113 X1.114 X1.116 X1.117 X1.118 X1.119 X1.120 X1.123 X1.124 X1.125 X1.126 X1.128 X1.130 X1.132 X1.133 X1.135 X1.136 X1.137 X1.138 X1.139 X1.140 X1.141 X1.142 X1.143 X1.144 X1.147 X1.148 X1.149 X1.150 X1.151 X1.152 X1.153 X1.154 X1.155 X1.156 X1.157 X1.159 X1.160 X1.161 X1.162 X1.163 X1.164 X1.165 X1.166 X1.168 X1.172 X1.174 X1.176 X1.178 X1.180 X1.184 X1.186 X1.188 X1.189 X1.190 X1.191 X1.192 X1.193 X1.197 X1.199 X1.201 X1.203 X1.205 X1.207 X1.211 X1.213 X1.215 X1.217 X1.219 X1.220 X1.221 X1.222 X1.225 X1.226 X1.227 X1.228 X1.231 X1.232 X1.233 X1.234 X1.235 X1.237 X1.238 X1.239 X1.240 X1.241 X1.244 X1.245 X1.247 X1.248 X1.249 X1.250 X1.252 X1.254 X1.256 X1.258

## Polygon pours and split planes (outlines as drawn)
no net on GND "NONET_L02_P000" (solid, pour order 0): 0,3995 0,0 5,5 3825,5 3825,3990 3820,3995

## Text inside footprints (layer, text, board x,y; h text height)
J7: Assembly Notes "PCB Thickness 1.1mm" at 3384.33,163.31 h31.5; Assembly Notes "PCB End" at 3470.94,537.32 h31.5
U1: Top Overlay "*" at 2304.26,956.36 h50 r90; Mechanical 13 "*" at 2342.5,1009 h50 r90
U3: Top Overlay "*" at 2528.64,1414.26 h50 r180; Mechanical 13 "*" at 2476,1452.5 h50 r180
U4: Top Overlay "*" at 2434.39,1735.46 h50 r180; Mechanical 13 "*" at 2394.5,1781.5 h50 r180